# Altium PCB SOM_PCB.PcbDoc (part 2 of 5)
Units mil, origin at the board's own origin, x right, y up, seen from the top; angles counter-clockwise.
Board outline 6000 x 4000 mil, 8 copper layers (Top Layer, Int1 (Sign), Int2 (GND), Int3 (Sign), Int4 (Sign), Int5 (PWR), Int6 (Sign), Bottom Layer), stack 60.424 mil thick; 76 components, 194 nets, 972 pads, 571 vias.
Unrouted connection lines stored in the file: 54.
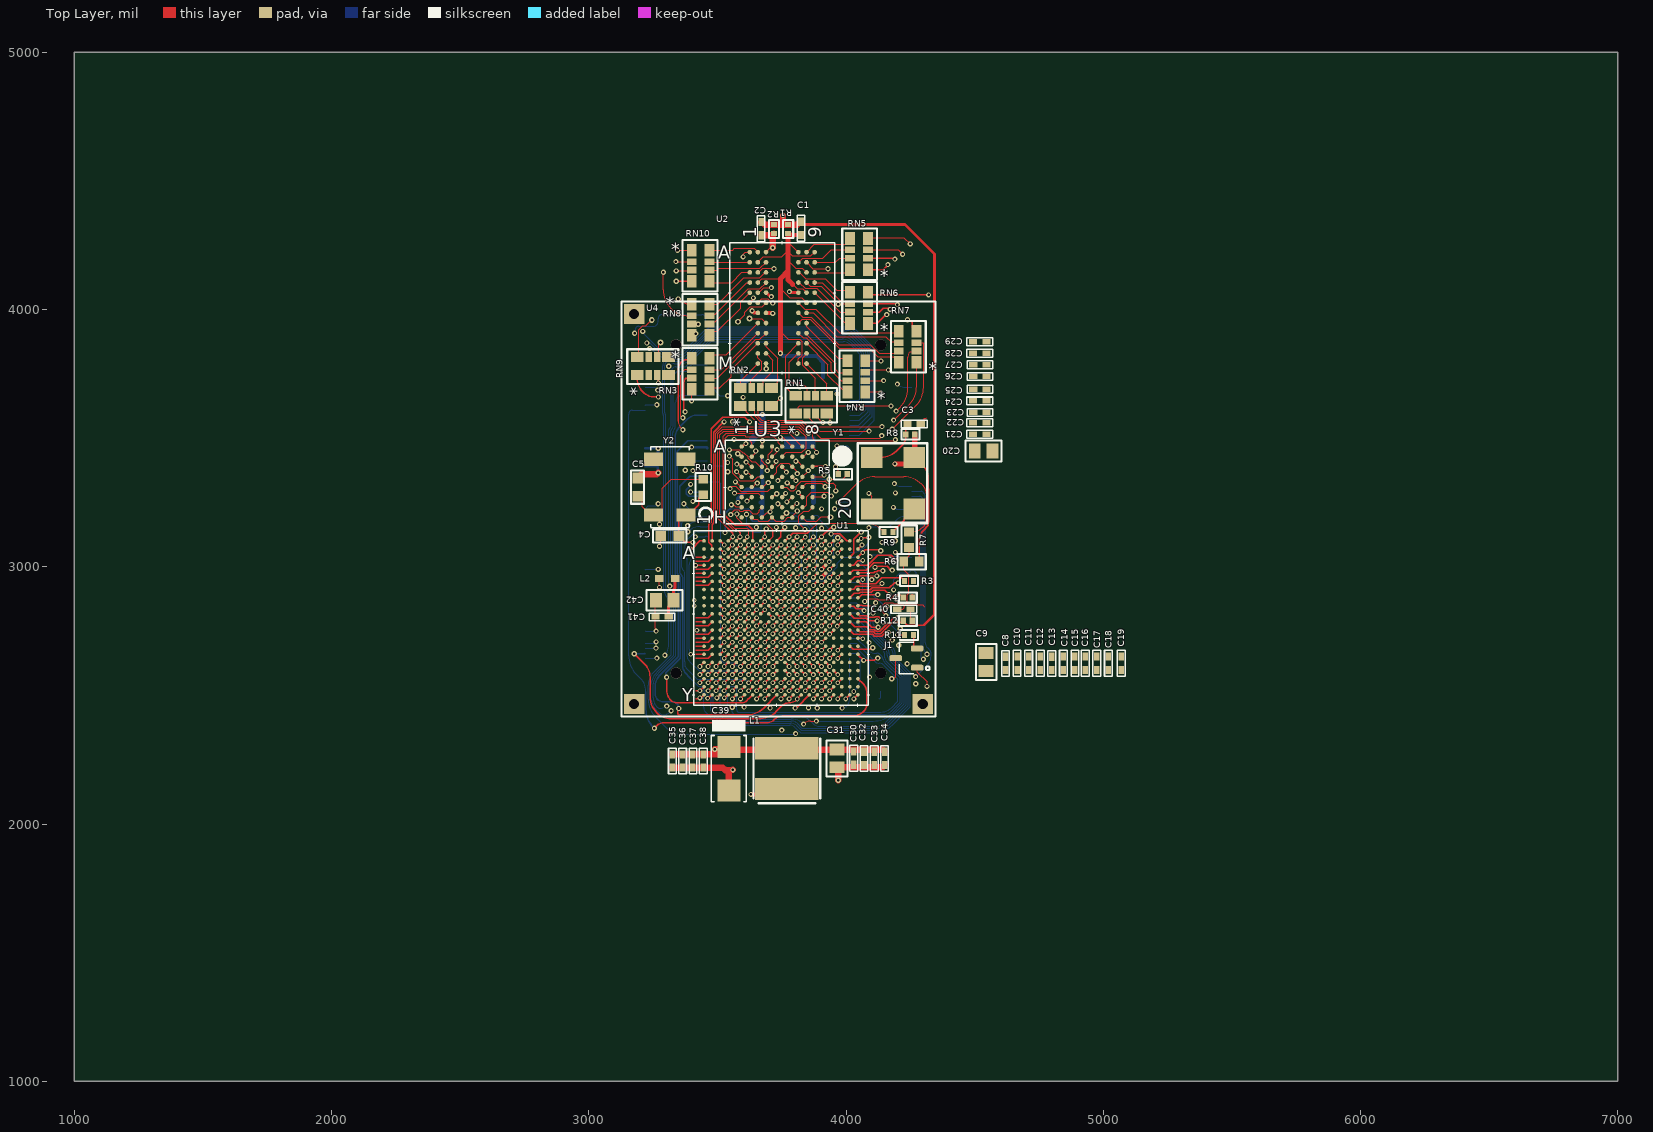
[diagram p0: Top Layer view]

## Part data (continued)
U6: "Trans MOSFET P-CH 20V 3.5A 8-Pin SOIC N T/R", Case/Package=SOIC, Continuous Drain Current (ID)=3.5A, Current Rating=-3.5A, Drain to Source Breakdown Voltage=-20V, Drain to Source Resistance=130mR, Drain to Source Voltage (Vdss)=20V, Gate to Source Voltage (Vgs)=8V, Input Capacitance=405pF, Manufacturer="ON Semiconductor / Fairchild", Manufacturer Part Number=FDS9431A, Max Operating Temperature=175°C, Max Power Dissipation=2.5W, Min Operating Temperature=-55°C, Package Quantity=2500, Threshold Voltage=-600mV, Category=MOSFETs, ComponentLink1Description=https://datasheet.ciiva.com/1256/fds9431a-1256128.pdf?src-supplier=Newark, ComponentLink1URL=https://datasheet.ciiva.com/1256/fds9431a-1256128.pdf?src-supplier=Newark, ComponentLink2Description=https://datasheet.ciiva.com/15137/getdatasheetpartid-70130-15137336.pdf?src-supplier=Verical, ComponentLink2URL=https://datasheet.ciiva.com/15137/getdatasheetpartid-70130-15137336.pdf?src-supplier=Verical, ComponentLink3Description=https://datasheet.ciiva.com/4441/fds9431a-111226-4441596.pdf?src-supplier=Mouser, ComponentLink3URL=https://datasheet.ciiva.com/4441/fds9431a-111226-4441596.pdf?src-supplier=Mouser, ComponentLink4Description=https://datasheet.ciiva.com/932/fds9431a-932295.pdf?src-supplier=Digi-Key, ComponentLink4URL=https://datasheet.ciiva.com/932/fds9431a-932295.pdf?src-supplier=Digi-Key, ComponentLink5Description=https://datasheet.ciiva.com/932/fds9431a-932296.pdf?src-supplier=Digi-Key, ComponentLink5URL=https://datasheet.ciiva.com/932/fds9431a-932296.pdf?src-supplier=Digi-Key, ComponentLink6Description=https://datasheet.ciiva.com/8114/fds9431a-8114667.pdf?src-supplier=Avnet, ComponentLink6URL=https://datasheet.ciiva.com/8114/fds9431a-8114667.pdf?src-supplier=Avnet, ComponentLink7Description=https://datasheet.ciiva.com/932/fds9431a-932294.pdf?src-supplier=Digi-Key, ComponentLink7URL=https://datasheet.ciiva.com/932/fds9431a-932294.pdf?src-supplier=Digi-Key, ComponentLink8Description=https://datasheet.ciiva.com/26141/fds9431a-26141927.pdf?src-supplier=Avnet+Europe, ComponentLink8URL=https://datasheet.ciiva.com/26141/fds9431a-26141927.pdf?src-supplier=Avnet+Europe, ComponentLink9Description=https://datasheet.ciiva.com/8114/fds9431a-8114671.pdf?src-supplier=Avnet, ComponentLink9URL=https://datasheet.ciiva.com/8114/fds9431a-8114671.pdf?src-supplier=Avnet, Contact Plating=Tin,Matte, Dual Supply Voltage=-20V, Element Configuration=Single, Fall Time=21ns, Height=1.5mm, Lead Free="Lead Free", Length=5mm, Mount="Surface Mount", Nominal Vgs=-600mV, Number of Elements=1, Number of Pins=8, On-State Resistance=130mR, Packaging="Tape and Reel", Power Dissipation=2.5W, Pricing 1="1=0.68000, 10=0.59800, 25=0.56160, 100=0.40750, 500=0.34046, 1000=0.28976 (USD)", Radiation Hardening=No, Rds On Max=130mR, REACH SVHC="No SVHC", Rise Time=20ns, RoHS=Yes, Stock 1=2709, Supplier 1=Digi-Key, Termination=SMD/SMT, Turn-Off Delay Time=31ns, Turn-On Delay Time=6.5ns, Voltage Rating (DC)=-20V, Weight=0.2304g, Width=4mm
Y1: library part CPPT7L-BR-25.0TS, "25MHz XO (Standard) TTL Oscillator 3.3V Enable/Disable 4-SMD, No Lead", Digi-Key Part Number=CPPT7L-BR-25.0TS-ND, Manufacturer="Cardinal Components Inc.", Package / Case="4-SMD, No Lead", Frequency=25MHz, Manufacturer Product Number=CPPT7L-BR-25.0TS, Supplier="Cardinal Components Inc."
Y2: library part ECS-.327-12.5-17-TR, "32.768kHz ±20ppm Crystal 12.5pF 50 kOhms 4-SOJ, 5.50mm pitch", Digi-Key Part Number=XC488TR-ND, Manufacturer="ECS Inc.", Frequency=32.768kHz, Manufacturer Product Number=ECS-.327-12.5-17-TR, Supplier="ECS Inc."

## Via types
v1: diameter 19, hole 10, Top Layer to Bottom Layer, 330 vias
v2: diameter 20, hole 10, Top Layer to Bottom Layer, 235 vias
v3: diameter 23, hole 11.81, Top Layer to Bottom Layer, 6 vias

## Nets (pads, with @x,y where several pads share a name; then routed paths per layer and width w, separated by ;. In a path a pad name is that pad's centre, name@x,y a point inside that pad or via, vN(x,y) a via of type N, cw(c..) or ccw(c..) an arc to the next point about the centre after c; other vN are vias at no path point)
+2V5: C1.2 C6.1 R1.2 U1.F10 U1.F11 U1.F12 U1.G15 U1.H13 U1.H14 U1.H15 U1.J14 U1.J15 U1.K14 U1.K15 U2.A7 U2.A9 U2.B2 U2.C8 U2.D2 U2.E8 U2.F8 U2.M7 U5.3 | length 8165.1
  Top Layer w4: U2.D2@3657.52,4105 3672.52,4120 3745,4120 ; U2.B2@3657.52,4183.74 3678.78,4205 3750,4205 3770,4225 3775,4225 3791.89,4208.11 3862.99,4208.11 U2.A9@3877.99,4223.11 ; 3745,3915 3775.93,3884.07 3820.93,3884.07 3830,3875 3830,3823.2 3815,3808.2 U2.M7@3815,3790.04 ; 3745,4082.13 3782.13,4045 3827.76,4045 U2.F8@3846.5,4026.26 ; 3775,4190.3 3805.3,4160 3830.87,4160 U2.C8@3846.5,4144.37 ; 3780,4258.11 U2.A7@3815,4223.11 ; 3792.69,4098.32 3810.38,4080.63 3831.5,4080.63 U2.E8@3846.5,4065.63
  Top Layer w5: U1.F10@3731.5,2942.99 v1(3747.24,2958.74) ; v1(3747.24,2927.24) U1.F11@3762.99,2942.99 ; v1(3778.74,2927.24) U1.F12@3794.49,2942.99 ; v1(3810.24,2864.25) U1.H13@3825.98,2880 ; v1(3841.73,2801.26) U1.K14@3857.48,2817.01 ; v1(3841.73,2832.76) U1.J14@3857.48,2848.5 ; v1(3841.73,2864.25) U1.H14@3857.48,2880 ; v1(3873.23,2801.26) U1.K15@3888.98,2817.01 ; v1(3873.23,2832.76) U1.J15@3888.98,2848.5 ; v1(3873.23,2864.25) U1.H15@3888.98,2880 ; v1(3873.23,2895.75) U1.G15@3888.98,2911.5
  Top Layer w15: R1.2@3777.54,4292.42 3785.72,4292.42 3788.1,4290.04 3821.66,4290.04 3821.7,4290 C1.2@3825,4290
  Top Layer w20: v2(3745,3830) 3745,3915 3745,4082.13 3745,4120 3775,4150 ; R1.2@3775,4294.96 3775,4225 3775,4190.3 3775,4150 ; 3792.69,4098.32 3775,4116.01 3775,4150
  Int6 (Sign) w3: 3395,2724.27 3655.12,2724.27 3655.85,2725 3790,2725 3790.73,2724.27 3871.27,2724.27 ccw(c3871.27,2743) 3884.5,2729.74 ccw(c3871.27,2743) 3890,2743 3890,2847.48 v1(3873.23,2864.25) ; 3395,2735 3450,2735 3470,2755 3838.22,2755 ccw(c3838.22,2775.62) 3852.79,2761.03 ccw(c3838.22,2775.62) 3858.85,2775.62 3858.85,2776.98 cw(c3882.75,2776.98) 3865.83,2793.87 ; 3395,2787 3816.04,2787 ccw(c3816.04,2814.61) 3828.55,2790 ccw(c3816.04,2814.61) 3835.56,2795.09 v1(3841.73,2801.26) ; 3395,2815.03 3526.7,2815.26 cw(c3526.77,2801.26) 3526.82,2815.26 3558.21,2815.26 cw(c3558.27,2801.26) 3558.32,2815.26 3589.71,2815.26 cw(c3589.76,2801.26) 3592.45,2815 3815,2815 ccw(c3815,2836.67) 3830.32,2821.35 v1(3841.73,2832.76) ; 3395,2905 3410.86,2905 cw(c3410.86,2870.86) 3434.98,2895.02 3476.46,2853.54 ccw(c3492.83,2869.9) 3492.83,2846.76 3824.24,2846.76 v1(3841.73,2864.25) ; 3395,2930 3410.86,2930 cw(c3410.86,2895.86) 3434.98,2920.02 3465,2890 ccw(c3489.14,2914.14) 3489.14,2880 3794.49,2880 v1(3810.24,2864.25) ; 3395,2960 3410.86,2960 cw(c3410.86,2925.86) 3434.98,2950.02 3465,2920 ccw(c3489.14,2944.14) 3489.14,2910 3761.5,2910 v1(3778.74,2927.24) ; 3395,2975 3445,2975 cw(c3445,2950.86) 3462.07,2967.93 3480,2950 ccw(c3501.14,2971.14) 3501.14,2941.24 3721.55,2941.24 3733.24,2929.55 3744.94,2929.55 v1(3747.24,2927.24) ; 3395,2991.2 3447.35,2991.2 cw(c3447.35,2963.55) 3466.9,2983.1 ccw(c3486.45,3002.65) 3486.45,2975 3730,2975 3746.26,2958.74 v1(3747.24,2958.74) ; 3865.85,2793.88 v1(3873.23,2801.26) ; v1(3873.23,2895.75) v1@3878.7,2890.28 ; v1@3878.7,2890.27 ccw(c3895.66,2907.24) 3895.66,2883.25 cw(c3895.66,2859.45) 3912.49,2876.29 3914.67,2874.11 cw(c3904.87,2864.31) 3918.72,2864.31 3918.72,2710 cw(c3896.93,2710) 3918.67,2708.45 ccw(c3921.66,2708.23) 3918.67,2707.98 cw(c3904.72,2706.77) 3918.72,2706.77 cw(c3904.72,2706.77) 3914.65,2696.9 cw(c3904.72,2706.77) 3914.59,2696.84 cw(c3904.72,2706.77) 3913.74,2696.06
  Int6 (Sign) w4: 3370,2725 3370.73,2724.27 3395,2724.27 ; 3370,2740 3375,2735 3395,2735 ; 3370,2785 3372,2787 3395,2787 ; 3370,2815 3374,2815 3374.95,2815 3395,2815.03 ; 3370,2905 3395,2905 ; 3370,2925 3375,2930 3395,2930 ; 3370,2955 3375,2960 3395,2960 ; 3370,2970 3375,2975 3395,2975 ; 3370,2985 3376.2,2991.2 3395,2991.2
  Int6 (Sign) w25: 3249.03,3774.03 3270.26,3795.26 cw(c3340.97,3724.55) 3276.51,3801 cw(c3340.97,3724.55) 3333.4,3824.26 cw(c3335.27,3799.33) 3337.01,3824.27 cw(c3335.27,3799.33) 3337.07,3824.27 ccw(c3339.8,3862.32) 3343.98,3824.4 cw(c3346.72,3799.55) 3346.79,3824.55 3731.84,3824.55 ccw(c3731.84,3843.16) v2(3745,3830) ; 3249.29,3773.78 ccw(c3320,3703.07) 3220,3703.07 3220,3506.42 ccw(c3320,3506.42) 3234.68,3454.26 ccw(c3320,3506.42) 3249.29,3435.71 3280.71,3404.29 cw(c3210,3333.58) 3310,3333.58 3310,3116.42 ccw(c3410,3116.42) 3339.29,3045.71 3360,3025 cw(c3335.86,3000.86) 3370,3000.86 3370,2985 3370,2970 3370,2955 3370,2925 3370,2905 3370,2815 3370,2785 3370,2740 3370,2725
  Bottom Layer w3: v1(3873.23,2832.76) v1(3873.23,2864.25)
  Bottom Layer w15: v2(3745,3830) 3755,3820 C6.1@3800,3820 3885,3820 3889.99,3815.01 3910.55,3794.45 U5.3@3910.55,3735
+3V3: C7.1 C8.2 C9.2 C10.2 C11.2 C12.2 C13.2 C14.2 C15.2 C16.2 C17.2 C18.2 C19.2 C20.2 C21.2 C22.2 C23.2 C24.2 C25.2 C26.2 C27.2 C28.2 C29.2 J1.3 R5.2 R6.2 R8.1 U1.E5 U1.E9 U1.E10 U1.E11 U1.E12 U1.F7 U1.F8 U1.F13 U1.F15 U1.G5 U1.G6 U1.G7 U1.G14 U1.H5 U1.H6 U1.K6 U1.M15 U1.N5 U1.N15 U1.P15 U1.R6 U1.R7 U1.R8 U1.R15 U1.T7 U1.T8 U1.T9 U1.T10 U1.T11 U1.T12 U1.T13 U1.T14 U1.T15 U1.T16 U3.A6 U3.D5 U3.D6 U3.G4 U3.H3 U4.71 U4.117 U4.118 U5.1 U6.1 U6.2 U6.3 Y1.4 | length 2303.5
  Top Layer w4: U3.H3@3673.15,3191.89 3691.34,3210.08 3702.08,3210.08 v2(3705.14,3213.15) 3705.14,3217.48 3710.03,3222.37 U3.G4@3710.03,3228.77 ; v2(3735.07,3334.97) 3748.18,3348.18 cw(c3751.03,3345.37) 3751.03,3349.37 U3.D5@3751.89,3349.37 ; v2(3745,3503) 3745.57,3503 3750.66,3508.08 U3.A6@3791.26,3467.48 ; U3.D6@3791.26,3349.37 3791.26,3348.74 v2(3805,3335) ; v2(3935,3340) 3986.81,3340 4005.04,3358.23 R5.2@4005.04,3360 ; v2(4177.98,2564.4) 4179.34,2564.16 4184.16,2564.16 4193.27,2573.27 J1.3@4193.27,2645
  Top Layer w5: U1.N5@3574.02,2722.52 3589.76,2738.27 v1(3589.76,2739) ; U1.H5@3574.02,2880 v1(3589.76,2895.75) ; U1.G5@3574.02,2911.5 v1(3589.76,2927.24) ; U1.E5@3574.02,2974.49 v1(3589.76,2990.24) ; v1(3589.76,2643.78) U1.R6@3605.51,2659.53 ; U1.K6@3605.51,2817.01 v1(3621.26,2832.76) ; U1.H6@3605.51,2880 v1(3621.26,2895.75) ; U1.G6@3605.51,2911.5 v1(3621.26,2927.24) ; v1(3621.26,2612.28) U1.T7@3637.01,2628.03 ; v1(3621.26,2644) 3621.37,2644 3636.9,2659.53 U1.R7@3637.01,2659.53 ; U1.G7@3637.01,2911.5 v1(3652.76,2927.24) ; U1.F7@3637.01,2942.99 v1(3652.76,2958.74) ; v1(3652.76,2612.28) U1.T8@3668.5,2628.03 ; v1(3652.76,2644) 3652.87,2644 3668.39,2659.53 U1.R8@3668.5,2659.53 ; U1.F8@3668.5,2942.99 v1(3684.25,2958.74) ; v1(3684.25,2612.28) U1.T9@3700,2628.03 ; U1.E9@3700,2974.49 v1(3715.75,2990.24) ; v1(3715.75,2612.28) U1.T10@3731.5,2628.03 ; U1.E10@3731.5,2974.49 v1(3747.24,2990.24) ; U1.T11@3762.99,2628.03 v1(3778.74,2612.28) ; U1.E11@3762.99,2974.49 v1(3778.74,2990.24) ; v1(3778.74,2958.74) U1.E12@3794.49,2974.49 ; U1.T12@3794.49,2628.03 v1(3810.24,2612.28) ; v1(3810.24,2927.24) U1.F13@3825.98,2942.99 ; U1.T13@3825.98,2628.03 v1(3841.73,2612.28) ; v1(3841.73,2895.75) U1.G14@3857.48,2911.5 ; U1.T14@3857.48,2628.03 v1(3873.23,2612.28) ; v1(3873.08,2738.63) U1.M15@3888.98,2754.02 ; v1(3873.23,2644) 3873.34,2644 3888.87,2659.53 U1.R15@3888.98,2659.53 ; v1(3873.23,2675.28) U1.P15@3888.98,2691.02 ; v1(3873.23,2706.77) U1.N15@3888.98,2722.52 ; v1(3873.23,2927.24) U1.F15@3888.98,2942.99 ; U1.T15@3888.98,2628.03 v1(3904.72,2612.28) ; U1.T16@3920.47,2628.03 v1(3936.22,2612.28) ; Y1.4@4265.35,3425 4302.5,3387.85 cw(c4259.65,3345) 4320.23,3346.46 cw(c4259.65,3345) 4320.25,3345 4321.19,3266.52 cw(c4306.69,3266.34) 4321.19,3266.34 4321.19,3183.66 cw(c4306.69,3183.66) 4321.17,3182.81 4319.96,3161.77 cw(c4314.97,3162.04) 4318.56,3158.56 4301.83,3141.83 ccw(c4342.17,3101.49) 4285.12,3101.49 R6.2@4285.12,3020
  Top Layer w20: v2(4190,3400) 4240.35,3400 Y1.4@4265.35,3425 4267.52,3427.17 R8.1@4267.52,3515
  Int1 (Sign) w3: v1@3589.76,2738.27 v1(3589.76,2739)
  Int1 (Sign) w4: v2@3734.6,3335 v2(3735.07,3334.97)
  Int3 (Sign) w3: 3417.92,2881.88 3418.05,2881.75
  Bottom Layer w3: v2(3967.72,3113.01) 3985,3113.01 3986.76,3114.76 U4.71@3986.76,3116.26
  Bottom Layer w4: v2(3375,3375) 3375,3400 3386.54,3411.54 U4.117@3459.88,3411.54 ; U4.118@3459.88,3391.85 3518.15,3391.85 3539.34,3370.66 3539.86,3369.96 v2(3540.19,3369.57) ; U6.1@3873.25,3350 3881.25,3342 3906.55,3342 3908.55,3340 v2(3935,3340)
  Bottom Layer w12: C7.1@3585,3714.13 3595,3724.13 v2(3595,3760)
  Bottom Layer w20: U6.3@3873.25,3250 U6.2@3873.25,3300 U6.1@3873.25,3350
  Bottom Layer w25: C7.1@3585,3714.13 3599.76,3714.13 3620.63,3735 U5.1@3729.45,3735
+VDD_INT: C30.2 C31.2 C32.2 C33.2 C34.2 C35.2 C36.2 C37.2 C38.2 C39.1 L1.2 L2.1 U1.F9 U1.G8 U1.G12 U1.G13 U1.J6 U1.J13 U1.L6 U1.L15 U1.P6 U1.P7 U1.P14 U1.R10 U1.R11 U1.R12 U1.U9 | length 6757.9
  Top Layer w4: L2.1@3274.49,2955 3274.49,2920.51 v2(3275,2920)
  Top Layer w5: v1(3589.76,2675.28) U1.P6@3605.51,2691.02 ; U1.L6@3605.51,2785.51 3605.64,2785.51 3621.13,2801 v1(3621.26,2801) ; U1.J6@3605.51,2848.5 v1(3621.26,2864.25) ; v1(3621.26,2675.28) U1.P7@3637.01,2691.02 ; U1.G8@3668.5,2911.5 v1(3684.25,2927.24) ; v1(3684.25,2580.79) U1.U9@3700,2596.54 ; U1.F9@3700,2942.99 v1(3715.75,2958.74) ; v1(3715.75,2644) 3715.86,2644 3731.39,2659.53 U1.R10@3731.5,2659.53 ; v1(3747.24,2644) 3747.35,2644 3762.88,2659.53 U1.R11@3762.99,2659.53 ; v1(3778.74,2644) 3778.85,2644 3794.38,2659.53 U1.R12@3794.49,2659.53 ; v1(3778.74,2895.75) U1.G12@3794.49,2911.5 ; v1(3810.24,2832.76) U1.J13@3825.98,2848.5 ; v1(3810.24,2895.75) U1.G13@3825.98,2911.5 ; v1(3841.73,2675.28) U1.P14@3857.48,2691.02 ; v1(3873.23,2769.76) U1.L15@3888.98,2785.51
  Top Layer w25: C35.2@3325,2270.76 C36.2@3365,2270.76 C37.2@3405,2270.76 C38.2@3445,2270.76 3516.65,2270.76 C39.1@3535.89,2290 ; v2(3490,2290) C39.1@3535.89,2290 ; C34.2@4150,2280.76 4150,2282.53 4143.12,2289.41 C31.2@3965,2289.41 3554.7,2289.41 C39.1@3545,2299.11 C39.1@3535.89,2290
  Int3 (Sign) w3: 3395,2785 3600,2785 ccw(c3600,2797.7) 3607.23,2787.26 ccw(c3600,2797.7) 3607.33,2787.33 ccw(c3600,2797.7) 3608.97,2788.71 v1(3621.26,2801) ; 3395,2830 3423.41,2830 ccw(c3423.41,2861.59) 3445.74,2839.24 cw(c3468.08,2816.92) 3468.08,2848.5 3605.51,2848.5 v1(3621.26,2864.25) ; v1(3589.76,2675.28) 3592.07,2672.97 3592.07,2661.28 3605.89,2647.45 3605.89,2607.85 3616.52,2597.22 3624.63,2597.22 3635.26,2586.59 3635.26,2574.74 3646.71,2563.29 3658.55,2563.29 3669.28,2552.57 3669.28,2466.28 3680.56,2455 ; v1(3621.26,2675.28) 3635.64,2660.9 3635.64,2641.32 3649.01,2627.95 3656.89,2627.95 3669.04,2615.8 3669.04,2596 v1(3684.25,2580.79) ; v1(3684.25,2927.24) 3700,2911.5 3700,2628.03 ; v2@3701.79,2455 3700,2457.24 3700,2565.04 v1(3684.25,2580.79) ; v2@3710,2455 3733.24,2478.24 3733.24,2559.48 ; v1(3715.75,2958.74) 3730,2944.49 3730,2562.73 3733.24,2559.48 ; v1@3715.97,2644 3700,2628.03 ; 3735.74,2455 3761.24,2480.5 3761.24,2492.14 3760.01,2493.37 3760.01,2505.01 3761.24,2506.24 3761.24,2555.09 3760,2556.33 3760,2625 3778.74,2643.74 v1(3778.74,2644) ; v1(3747.24,2644) 3747.24,2573.48 3733.24,2559.48 ; 3767.24,2455 3782.24,2470 ; v1(3778.74,2895.75) 3794.49,2880 ; v1(3810.24,2895.75) 3794.49,2880 ; v1(3873.23,2769.76) 3857.48,2754.02 3857.48,2702.72 3844.04,2689.28 3844.04,2677.58 v1(3841.73,2675.28) 3827.73,2661.28 3827.73,2472.73 3825,2470 3782.24,2470 ; v1(3684.25,2580.79) 3686.55,2583.09 3686.55,2594.79 3700,2608.23 3700,2628.03 ; 3782.24,2470 3795,2482.76 3795,2817.52 v1(3810.24,2832.76) 3807.93,2835.06 3807.93,2846.76 3794.49,2860.2 3794.49,2880
  Int3 (Sign) w4: 3230,2572.52 cw(c3152.01,2572.28) 3230,2572.28 3230,2572.04 3230,2341.21 ccw(c3281.21,2341.21) 3245,2305 ccw(c3305.36,2365.36) 3305.36,2280 3465.86,2280 ccw(c3465.86,2314.14) 3480.83,2283.46 ccw(c3465.86,2314.14) v2(3490,2290) 3308.28,2290 cw(c3308.28,2359.28) 3239,2359.28 3239,2579.66 ccw(c3175.41,2579.66) 3220.41,2624.59 ccw(c3175.41,2579.66) 3220.37,2624.63 3215,2630 cw(c3227.07,2642.07) 3210,2642.07 3210,2755.86 cw(c3244.14,2755.86) 3220,2780 cw(c3232.07,2767.93) 3232.07,2785 3395,2785 ; 3230,2572.54 ccw(c3226,2572.54) 3229.97,2572.97 3227.28,2597.94 ccw(c3211.37,2596.26) 3223.85,2606.27 3209.9,2623.78 3207.67,2626.79 3207.52,2627 ccw(c3204.3,2624.62) 3207.13,2627.45 cw(c3236.51,2656.77) 3204.74,2630.06 cw(c3236.51,2656.77) 3195,2656.77 3195,2855 cw(c3254.94,2855) 3212.56,2897.39 cw(c3267.15,2842.8) 3267.15,2920 v2(3275,2920) 3280.29,2920 cw(c3280.29,2885.29) 3304.83,2909.83 3377.36,2837.31 ccw(c3395,2854.95) 3395,2830 ; 3680.56,2455 3685.56,2450 v2@3705,2450 ; v2@3710,2455 v2@3705,2450 ; 3735.74,2455 3730.74,2450 ; 3767.24,2455 3762.24,2450 3730.74,2450 ; v2@3705,2450 3730.74,2450
  Int3 (Sign) w5: v2@3701.79,2455 v2(3705,2451)
  Int6 (Sign) w15: v2(3490,2290) 3625,2290 ccw(c3625,2374.5) 3684.72,2314.72 ; 3684.75,2314.75 3692.5,2322.5 ccw(c3662.32,2352.68) 3705,2352.68 v2(3705,2451)

## Text inside footprints (layer, text, board x,y; h text height)
U1: Top Overlay "A" at 3365,3030 h50; Top Overlay "Y" at 3362.74,2477.05 h50; Top Overlay "1" at 3473.03,3160.76 h50 r90; Top Overlay "20" at 4020,3185 h50 r90; Mechanical 13 "A" at 3362.74,3075.47 h50; Mechanical 13 "Y" at 3362.74,2477.05 h50; Mechanical 13 "1" at 3473.03,3160.76 h50 r90; Mechanical 13 "20" at 4071.46,3160.76 h50 r90; Bottom Overlay "A" at 3387.74,3075.47 h50; Bottom Overlay "Y" at 3387.74,2477.05 h50; Bottom Overlay "1" at 3423.03,3160.76 h50 r270; Bottom Overlay "20" at 4021.46,3160.76 h50 r270
U2: Top Overlay "M" at 3503.01,3765.04 h50; Top Overlay "9" at 3902.99,4279.57 h50 r90; Top Overlay "1" at 3651.02,4279.57 h50 r90; Top Overlay "A" at 3503.01,4198.11 h50; Mechanical 13 "9" at 3902.99,4279.57 h50 r90; Mechanical 13 "1" at 3651.02,4279.57 h50 r90; Mechanical 13 "M" at 3503.01,3765.04 h50; Mechanical 13 "A" at 3503.01,4198.11 h50; Bottom Overlay "9" at 3852.99,4279.57 h50 r270; Bottom Overlay "1" at 3601.02,4279.57 h50 r270; Bottom Overlay "M" at 3535,3760 h50; Bottom Overlay "A" at 3528.01,4198.11 h50
U3: Top Overlay "H" at 3485.2,3166.89 h50; Top Overlay "8" at 3895,3512.18 h50 r90; Top Overlay "1" at 3619.41,3512.18 h50 r90; Top Overlay "A" at 3485.2,3442.48 h50; Mechanical 13 "8" at 3895,3512.18 h50 r90; Mechanical 13 "1" at 3619.41,3512.18 h50 r90; Mechanical 13 "H" at 3485.2,3166.89 h50; Mechanical 13 "A" at 3485.2,3442.48 h50; Bottom Overlay "8" at 3845,3512.18 h50 r270; Bottom Overlay "1" at 3569.41,3512.18 h50 r270; Bottom Overlay "H" at 3510.2,3166.89 h50; Bottom Overlay "A" at 3510.2,3442.48 h50
U6: Mechanical 13 "*" at 3846,3320.5 h50; Bottom Overlay "*" at 3940,3325 h50